# Altium PCB PCB.PcbDoc
Units mm, origin at the board's own origin, x right, y up, seen from the top; angles counter-clockwise.
Board outline 65.41 x 56.4 mm, 2 copper layers (Top Layer, Bottom Layer); 36 components, 31 nets, 204 pads, 254 vias.
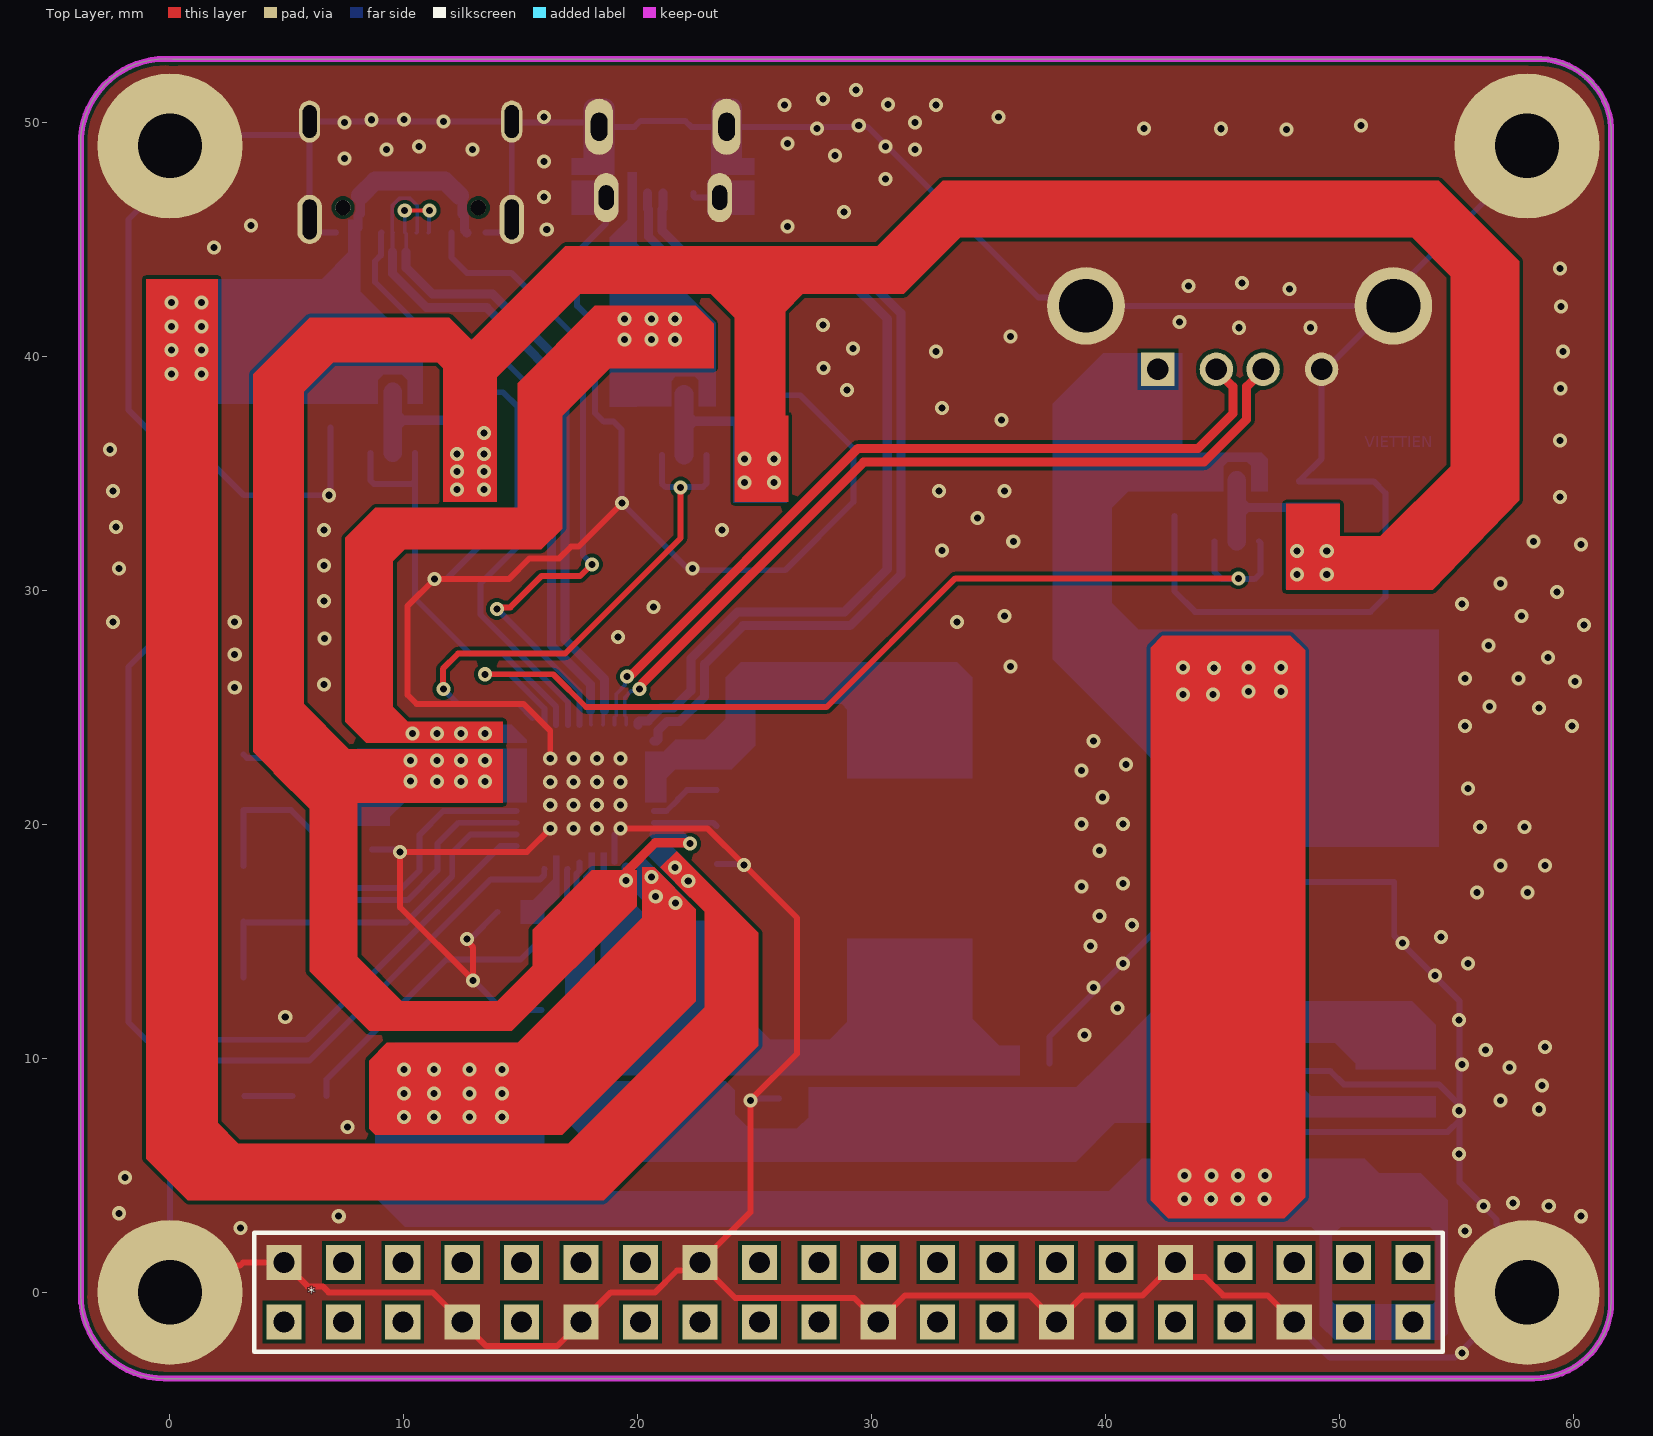
[diagram p0: Top Layer view]
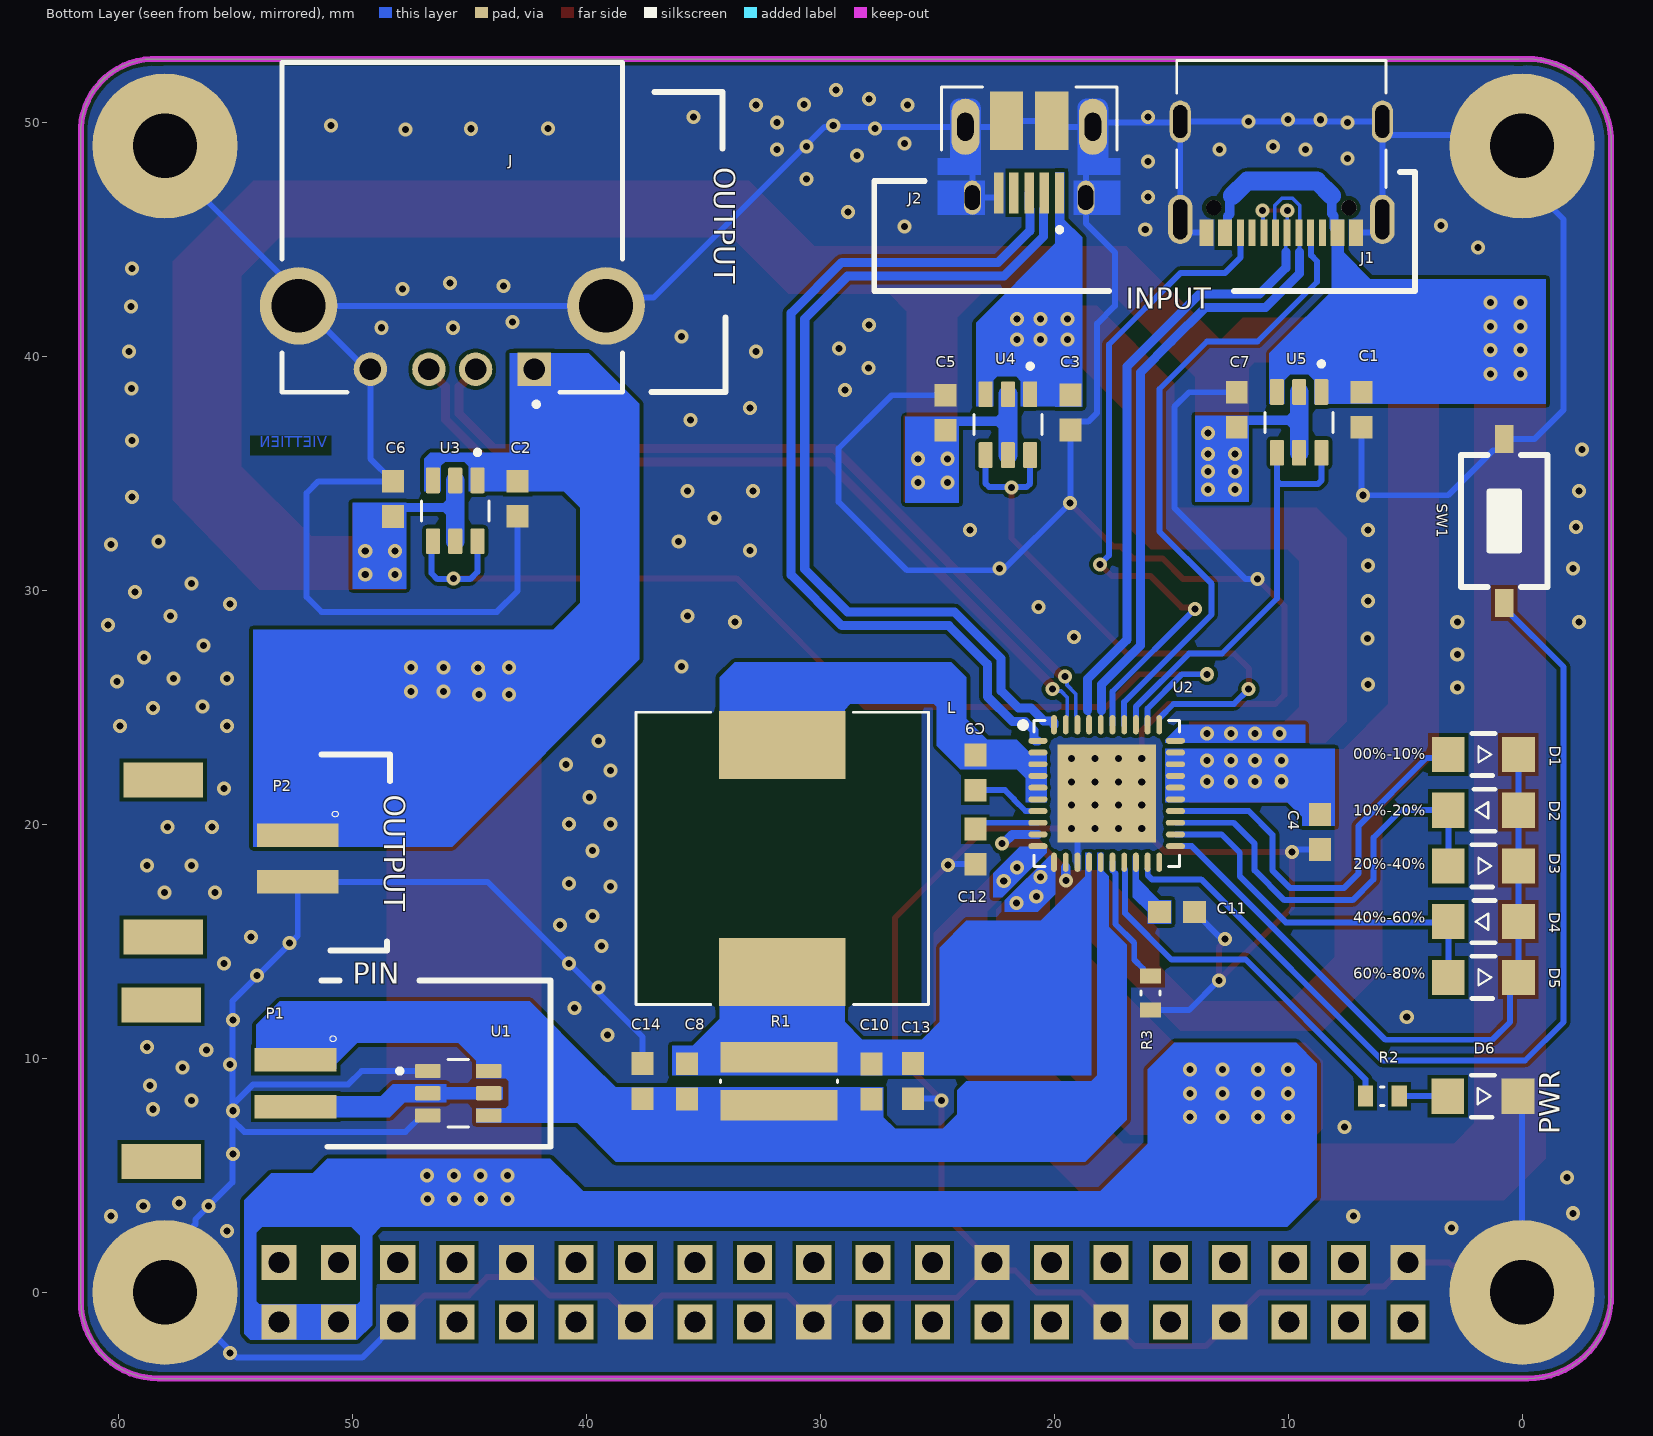
[diagram p1: Bottom Layer view, seen from below]
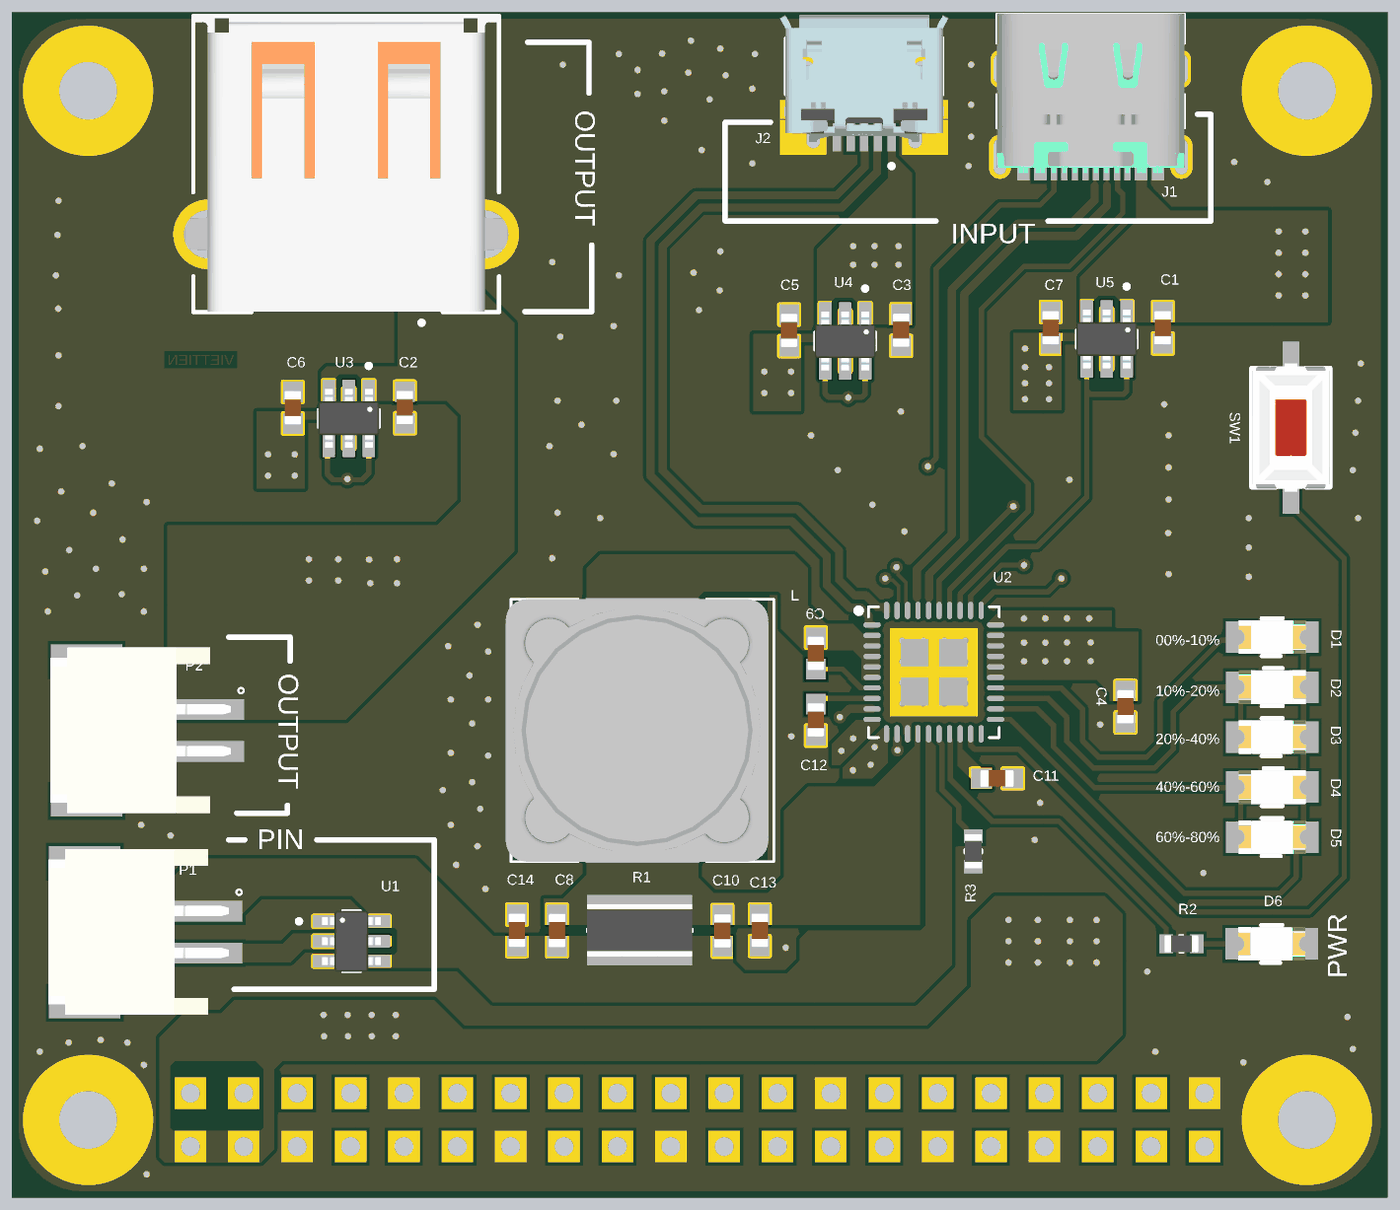
[diagram p2: 3D render of the assembled board from below, using the file's embedded part models]

## Layer stack, top to bottom
Top Solder: solder mask 0.0102, Solder Resist, Dk 3.5
Top Layer: signal copper 0.0356
Dielectric 1: dielectric 0.32, FR-4, Dk 4.8
Bottom Layer: signal copper 0.0356
Bottom Solder: solder mask 0.0102, Solder Resist, Dk 3.5

## Board outline
-0.254,-3.683 cw(c-0.254,-0.127) -3.81,-0.127 -3.81,49.403 cw(c-0.191,49.085) 0.127,52.705 58.293,52.705 cw(c58.483,49.593) 61.595,49.784 61.595,-0.381 cw(c58.293,-0.381) 58.293,-3.683

## Design rules (kind name [scope] priority, off if disabled: settings)
Clearance [All] p1: gap=0.154 ignorepadtopadclearanceinfootprint=FALSE
DiffPairsRouting C_D [InDifferentialPair('C_D')] p1: maxlimit=0.2 minlimit=0.2 mostfreqgap=0.2 toplayer_minwidth=0.16 toplayer_maxwidth=0.386 toplayer_prefwidth=0.386 bottomlayer_minwidth=0.16 bottomlayer_maxwidth=0.386 bottomlayer_prefwidth=0.386 impedanceprofiledriven=TRUE impedanceprofileid={D8D8F75F-E2CB-452B-AE5A-61E75BC29C10} impedanceprofilevalue=90.000000 maxuncoupledlength=12.7
DiffPairsRouting B_D [InDifferentialPair('B_D')] p2: maxlimit=0.2 minlimit=0.2 mostfreqgap=0.2 toplayer_minwidth=0.16 toplayer_maxwidth=0.386 toplayer_prefwidth=0.386 bottomlayer_minwidth=0.16 bottomlayer_maxwidth=0.386 bottomlayer_prefwidth=0.386 impedanceprofiledriven=TRUE impedanceprofileid={D8D8F75F-E2CB-452B-AE5A-61E75BC29C10} impedanceprofilevalue=90.000000 maxuncoupledlength=12.7
DiffPairsRouting A_D [InDifferentialPair('A_D')] p3: maxlimit=0.2 minlimit=0.2 mostfreqgap=0.2 toplayer_minwidth=0.16 toplayer_maxwidth=0.386 toplayer_prefwidth=0.386 bottomlayer_minwidth=0.16 bottomlayer_maxwidth=0.386 bottomlayer_prefwidth=0.386 impedanceprofiledriven=TRUE impedanceprofileid={D8D8F75F-E2CB-452B-AE5A-61E75BC29C10} impedanceprofilevalue=90.000000 maxuncoupledlength=12.7
HoleSize [All] p1: absolutevalues=TRUE maxlimit=10 minlimit=0.025 maxpercent=80.000 minpercent=20.000
MinimumSolderMaskSliver [All] p1: minsoldermaskwidth=0.01
PolygonConnect [All] p1: connectstyle=Direct reliefconductorwidth=0.254 reliefentries=4 polygonreliefangle="90 Angle" airgapwidth=0.254
RoutingVias [All] p1: holewidth=0.3 width=0.6 viastyle="Through Hole" minholewidth=0.3 minwidth=0.6 maxholewidth=0.3 maxwidth=0.6
SilkToSilkClearance [All] p1: silktosilkclearance=0.01
SilkToSolderMaskClearance [IsPad] p1: minsilkscreentomaskgap=0.01 clearancetoexposedcopper=TRUE
SolderMaskExpansion [All] p1: expansion=0 istentingtop=FALSE
SupplyNets "Schematic Supply Nets_4" [InNet('VOUT')] p1: voltage=0.000
SupplyNets "Schematic Supply Nets_3" [InNet('VBUS_A')] p2: voltage=0.000
SupplyNets "Schematic Supply Nets_2" [InNet('VBUS_C')] p3: voltage=0.000
SupplyNets "Schematic Supply Nets_1" [InNet('GND')] p4: voltage=0.000
SupplyNets "Schematic Supply Nets" [InNet('VBUS_B')] p5: voltage=0.000
Width VOUT [InNet('VOUT')] p1: maxlimit=0.8 minlimit=0.4 preferedwidth=0.6
Width VBUS_C [InNet('VBUS_C')] p2: maxlimit=0.8 minlimit=0.4 preferedwidth=0.6
Width VBUS_B [InNet('VBUS_B')] p3: maxlimit=0.8 minlimit=0.4 preferedwidth=0.6
Width VBUS_A [InNet('VBUS_A')] p4: maxlimit=0.8 minlimit=0.4 preferedwidth=0.6
Width [All] p5: maxlimit=0.254 minlimit=0.254 preferedwidth=0.254
25 further rules are at their usual default settings.

## Classes and differential pairs
differential pair C_D: +C_D_P -C_D_N
differential pair B_D: +B_D_P -B_D_N
differential pair A_D: +A_D_P -A_D_N

## Components (designator, comment, footprint, x,y, rotation, side; value= is the part's Value field where it differs from the comment)
* "J" GPIO_INTERFACE 3.6,2.54 r270 top locked
C1 "10uF" CAPC1608X94N 6.858,37.719 r90 bottom
C2 "10uF" CAPC1608X94N 42.926,33.921 r90 bottom
C3 "10uF" CAPC1608X94N 19.304,37.604 r90 bottom
C4 "22uF" CAPC1608X94N 8.636,19.673 r90 bottom
C5 "22uF" CAPC1608X94N 24.638,37.592 r270 bottom
C6 "22uF" CAPC1608X94N 48.26,33.909 r270 bottom
C7 "22uF" CAPC1608X94N 12.192,37.719 r270 bottom
C8 "100uF" CAPC1608X94N 35.687,9.017 r90 bottom
C9 "100uF" CAPC1608X94N 23.368,22.213 r90 bottom
C10 "22uF" CAPC1608X94N 27.813,9.005 r90 bottom
C11 "1uF" CAPC1608X94N 14.744,16.256 r0 bottom
C12 "1uF" CAPC1608X94N 23.368,19.05 r90 bottom
C13 "22uF" CAPC1608X94N 26.035,9.029 r270 bottom
C14 "22uF" CAPC1608X94N 37.592,9.029 r90 bottom
D1 "WL-SMCW_1206" WL-SMCW_1206 1.651,22.987 r0 bottom
D2 "WL-SMCW_1206" WL-SMCW_1206 1.651,20.606 r180 bottom
D3 "WL-SMCW_1206" WL-SMCW_1206 1.651,18.224 r0 bottom
D4 "WL-SMCW_1206" WL-SMCW_1206 1.651,15.843 r180 bottom
D5 "WL-SMCW_1206" WL-SMCW_1206 1.651,13.462 r0 bottom
D6 "WL-SMCW_1206" WL-SMCW_1206 1.675,8.382 r0 bottom
J "USBR-A-S-S-O-TH" SAMTEC_USBR-A-S-S-O-TH 45.72,42.164 r0 bottom
J1 "TypeC_12pin_12402012E212A" TypeC_12pin_12402012E212A 10.287,50.038 r0 bottom
J2 "10103594-0001LF" AMPHENOL_10103594-0001LF 21.067,49.815 r0 bottom
L "2.2uH" Introdutor_47uH_12x12x7 31.623,18.542 r90 bottom
P1 "S2B-PH-SM4-TB" JST_S2B-PH-SM4-TB 52.416,8.938 r90 bottom
P2 "S2B-PH-SM4-TB" JST_S2B-PH-SM4-TB 52.324,18.542 r90 bottom
R1 "5mR" RES_ERJB1CFR015U 31.75,9.026 r270 bottom
R2 "2K" RES_ERJU03J474V 5.969,8.382 r0 bottom
R3 "10K" RES_ERJU03J474V 15.875,12.79 r90 bottom
SW1 "Nut Nhan 2 Chan SMD 3x6x2.5" PCBComponent_1 -1.016,28.9 r90 bottom
U1 "SC8205S" IC_SN6505ADBVR 45.466,8.509 r180 bottom
U2 "SW6106" QFN50P600X600X80-41N 17.752,21.32 r180 bottom
U3 "SC8205S" IC_SN6505ADBVR 45.593,33.401 r270 bottom
U4 "SC8205S" IC_SN6505ADBVR 21.971,37.084 r270 bottom
U5 "SC8205S" IC_SN6505ADBVR 9.525,37.181 r270 bottom

## Footprints (in the part's own frame and the unit in brackets; to place one, negate y for a bottom-side part, rotate by r counter-clockwise, add the part's x,y. Pads: shape width x height; smd on the part's side, far side on the other; paste and mask are expansions set on the pad)
AMPHENOL_10103594-0001LF [mm]
  rect 0.4x1.75 smd: 1(-1.3,2.825) 2(-0.65,2.825) 3(0,2.825) 4(0.65,2.825) 5(1.3,2.825)
  oval 0.73x1.46 hole 0.65 slot 1.05 at 90 deg mask+0: 6(-2.425,3.03) 7(2.425,3.03)
  oval 1.2x2.4 hole 0.7 slot 1.2 at 90 deg: 8(-2.725,0) 9(2.725,0)
  oval 1.05x2.1 smd far side paste-2: 10(-2.425,3.03) 11(2.425,3.03)
  rect 1.425x2.5 smd: S1(-0.962,-0.25) S2(0.962,-0.25)
  Top Layer region: -1.9,2.3 -3.9,2.3 -3.9,3.76 -1.9,3.76
  Top Layer region: 3.9,2.3 1.9,2.3 1.9,3.76 3.9,3.76
  Top Layer region: -2.075,-0.8 -2.076,-0.821 -2.077,-0.842 -2.08,-0.863 -2.084,-0.883 -2.089,-0.904 -2.095,-0.924 -2.102,-0.943 -2.11,-0.963 -2.119,-0.982 -2.129,-1 -2.14,-1.018 -2.151,-1.035 -2.164,-1.052 -2.178,-1.068 -2.192,-1.083 -2.207,-1.097 -2.223,-1.111 -2.24,-1.124 -2.257,-1.135 -2.275,-1.146 -2.293,-1.156 -2.312,-1.165 -2.332,-1.173 -2.351,-1.18 -2.371,-1.186 -2.392,-1.191 -2.412,-1.195 -2.433,-1.198 -2.454,-1.199 -2.475,-1.2 -2.975,-1.2 -2.996,-1.199 -3.017,-1.198 -3.038,-1.195 -3.058,-1.191 -3.079,-1.186 -3.099,-1.18 -3.118,-1.173 -3.138,-1.165 -3.157,-1.156 -3.175,-1.146 -3.193,-1.135 -3.21,-1.124 -3.227,-1.111 -3.243,-1.097 -3.258,-1.083 -3.272,-1.068 -3.286,-1.052 -3.299,-1.035 -3.31,-1.018 -3.321,-1 -3.331,-0.982 -3.34,-0.963 -3.348,-0.943 -3.355,-0.924 -3.361,-0.904 -3.366,-0.883 -3.37,-0.863 -3.373,-0.842 -3.374,-0.821 -3.375,-0.8 -3.375,1.35 -3.9,1.35 -3.9,2.05 -2.075,2.05
  Top Layer region: 3.9,1.35 3.375,1.35 3.375,-0.8 3.374,-0.821 3.373,-0.842 3.37,-0.863 3.366,-0.883 3.361,-0.904 3.355,-0.924 3.348,-0.943 3.34,-0.963 3.331,-0.982 3.321,-1 3.31,-1.018 3.299,-1.035 3.286,-1.052 3.272,-1.068 3.258,-1.083 3.243,-1.097 3.227,-1.111 3.21,-1.124 3.193,-1.135 3.175,-1.146 3.157,-1.156 3.138,-1.165 3.118,-1.173 3.099,-1.18 3.079,-1.186 3.058,-1.191 3.038,-1.195 3.017,-1.198 2.996,-1.199 2.975,-1.2 2.475,-1.2 2.454,-1.199 2.433,-1.198 2.412,-1.195 2.392,-1.191 2.371,-1.186 2.351,-1.18 2.332,-1.173 2.312,-1.165 2.293,-1.156 2.275,-1.146 2.257,-1.135 2.24,-1.124 2.223,-1.111 2.207,-1.097 2.192,-1.083 2.178,-1.068 2.164,-1.052 2.151,-1.035 2.14,-1.018 2.129,-1 2.119,-0.982 2.11,-0.963 2.102,-0.943 2.095,-0.924 2.089,-0.904 2.084,-0.883 2.08,-0.863 2.077,-0.842 2.076,-0.821 2.075,-0.8 2.075,2.05 3.9,2.05
  silkscreen extent -3.75,-1.7 3.75,4.5, body extent -4.02,-2.79 4.02,3.24, height 2.89
CAPC1608X94N [mm]
  rect 0.97x0.94 smd paste+0 mask+0.102: 1(-0.75,0) 2(0.75,0)
  body extent -0.8,-0.4 0.8,0.4, height 0.94
GPIO_INTERFACE [mm]
  rect 1.5x1.5 hole 0.9: 1(1.27,49.53) 2(3.81,49.53) 3(1.27,46.99) 4(3.81,46.99) 5(1.27,44.45) 6(3.81,44.45) 7(1.27,41.91) 8(3.81,41.91) 9(1.27,39.37) 10(3.81,39.37) 11(1.27,36.83) 12(3.81,36.83) 13(1.27,34.29) 14(3.81,34.29) 15(1.27,31.75) 16(3.81,31.75) 17(1.27,29.21) 18(3.81,29.21) 19(1.27,26.67) 20(3.81,26.67) 21(1.27,24.13) 22(3.81,24.13) 23(1.27,21.59) 24(3.81,21.59) 25(1.27,19.05) 26(3.81,19.05) 27(1.27,16.51) 28(3.81,16.51) 29(1.27,13.97) 30(3.81,13.97) 31(1.27,11.43) 32(3.81,11.43) 33(1.27,8.89) 34(3.81,8.89) 35(1.27,6.35) 36(3.81,6.35) 37(1.27,3.81) 38(3.81,3.81) 39(1.27,1.27) 40(3.81,1.27)
  silkscreen extent 0,0 5.08,50.8
IC_SN6505ADBVR [mm]
  rrect17% 1.1x0.6 smd paste+0 mask+0: 1(-1.3,0.95) 2(-1.3,0) 3(-1.3,-0.95) 4(1.3,-0.95) 5(1.3,0) 6(1.3,0.95)
  silkscreen extent -2.6,-1.45 0.43,1.45, body extent -1.4,-1.45 1.4,1.45, height 1.45
Introdutor_47uH_12x12x7 [mm]
  rect 2.9x5.4 smd: 1(-4.85,0) 2(4.85,0)
  silkscreen extent -6.25,-6.25 6.25,6.25, body extent -6.25,-6 6.25,6.5, height 6
JST_S2B-PH-SM4-TB [mm]
  rect 1x3.5 smd: 1(1,0) 2(-1,0)
  rect 1.5x3.4 smd: P1(3.35,5.75) P2(-3.35,5.75)
  silkscreen extent 1.77,-1.73 2.03,-1.47, body extent -3.94,-1.12 3.96,7.48, height 5.63
PCBComponent_1 [mm]
  rect 1.2x0.8 smd: 1(0.564,1.778) 2(7.564,1.778)
  silkscreen extent 1.24,-0.08 6.88,3.63, body extent 1.01,-0.07 7.11,3.63, height 2.5
QFN50P600X600X80-41N [mm] "QFN, 40-Leads, Body 6.00x6.00mm, Pitch 0.50mm, Thermal Pad 4.20x4.20mm, IPC Medium Density"
  oval 0.825x0.25 smd: 1(-2.937,2.25) 2(-2.937,1.75) 3(-2.937,1.25) 4(-2.937,0.75) 5(-2.937,0.25) 6(-2.937,-0.25) 7(-2.937,-0.75) 8(-2.937,-1.25) 9(-2.937,-1.75) 10(-2.937,-2.25) 21(2.937,-2.25) 22(2.937,-1.75) 23(2.937,-1.25) 24(2.937,-0.75) 25(2.937,-0.25) 26(2.937,0.25) 27(2.937,0.75) 28(2.937,1.25) 29(2.937,1.75) 30(2.937,2.25)
  oval 0.25x0.825 smd: 11(-2.25,-2.937) 12(-1.75,-2.937) 13(-1.25,-2.937) 14(-0.75,-2.937) 15(-0.25,-2.937) 16(0.25,-2.937) 17(0.75,-2.937) 18(1.25,-2.937) 19(1.75,-2.937) 20(2.25,-2.937) 31(2.25,2.937) 32(1.75,2.937) 33(1.25,2.937) 34(0.75,2.937) 35(0.25,2.937) 36(-0.25,2.937) 37(-0.75,2.937) 38(-1.25,2.937) 39(-1.75,2.937) 40(-2.25,2.937)
  rect 4.2x4.2 smd paste-2.1: 41(0,0)
  silkscreen extent -3.7,-3.11 3.11,3.11, body extent -3.05,-3.05 3.05,3.05, height 0.8
RES_ERJB1CFR015U [mm]
  rect 1.3x5 smd: 1(-1.025,0) 2(1.025,0)
  silkscreen extent -0.06,-2.5 0.06,2.5, body extent -1.25,-2.5 1.25,2.5, height 0.55
RES_ERJU03J474V [mm]
  rect 0.65x0.9 smd: 1(-0.725,0) 2(0.725,0)
  silkscreen extent -0.08,-0.4 0.08,0.4, body extent -0.8,-0.4 0.8,0.4, height 0.45
SAMTEC_USBR-A-S-S-O-TH [mm]
  rect 1.428x1.428 hole 0.92: 1(-3.5,2.71)
  round 1.428 hole 0.92: 2(-1,2.71) 3(1,2.71) 4(3.5,2.71)
  round 3.316 hole 2.3: S1(-6.57,0) S2(6.57,0)
  silkscreen extent -7.27,-10.4 7.27,4.31, body extent -7.85,-10.42 7.85,3.68, height 7.77
TypeC_12pin_12402012E212A [mm]
  rect 0.6x1.14 smd: A1_B12(-3.2,4.75) A4_B9(-2.4,4.75) B1_A12(3.2,4.75) B4_A9(2.4,4.75)
  rect 0.3x1.14 smd: A5(-1.25,4.75) A6(-0.25,4.75) A7(0.25,4.75) A8(1.25,4.75) B5(1.75,4.75) B6(0.75,4.75) B7(-0.75,4.75) B8(-1.75,4.75)
  oval 1.05x2.1 hole 0.6 slot 1.7 at 90 deg: SH1(-4.32,4.18) SH2(4.32,4.18)
  oval 0.9x1.8 hole 0.6 slot 1.4 at 90 deg: SH3(-4.32,0) SH4(4.32,0)
  round 0.65 hole 0.65 unplated: ""(-2.89,3.68) ""(2.89,3.68)
  silkscreen extent -4.47,-2.6 4.47,2.81, body extent -4.47,-2.65 4.47,4.95, height 3.15
WL-SMCW_1206 [mm]
  rect 1.4x1.5 smd: 1(-1.5,0) 2(1.5,0)
  silkscreen extent -0.5,-0.9 0.5,0.9, body extent -1.6,-0.8 1.6,0.8, height 0.68

## Part data
*: library part RASPBERRY_INTERFACE, "RASPBERRY_INTERFACE"
C1 C2 C3 C4 C5 C6 C7 C8 C9 C10 C11 C12 C13 C14: library part cap_0603_VJ0603D3R9DXCAP, "cap 0603 (1608 Metric)", Package="1608 Vishay Vitramon", Check_prices=https://www.snapeda.com/parts/VJ0603D3R9DXCAP/Vishay/view-part/?ref=eda, MF="Vishay Vitramon", MP=VJ0603D3R9DXCAP, SnapEDA_Link=https://www.snapeda.com/parts/VJ0603D3R9DXCAP/Vishay/view-part/?ref=snap
D1 D2 D3 D4 D5 D6: "1206, Blue Typ.(@20mA): 470nm, 145mcd, 3.2V, 140Â° InGaN", Package="1206 Wurth Electronics", Check_prices=https://www.snapeda.com/parts/150120BS75000/Wurth+Electronics/view-part/?ref=eda, MF="Wurth Electronics", MP=150120BS75000, SnapEDA_Link=https://www.snapeda.com/parts/150120BS75000/Wurth+Electronics/view-part/?ref=snap
J: "USB-A _USB TYPE-A_ USB 2.0 Receptacle Connector 4 Position Through Hole, Right Angle", Package=None, Availability=Unavailable, MF=Samtec, MP=USBR-A-S-S-O-TH, Price=None, SnapEDA_Link=https://www.snapeda.com/parts/USBR-A-S-S-O-TH/Samtec%20Inc./view-part/279681/?ref=snap
J1: "USB2.0, Type C, Top mount, CH 1.68mm, Dual Row SMT", Package=None, Availability="In Stock", Check_prices=https://www.snapeda.com/parts/12402012E212A/Amphenol/view-part/?ref=eda, MF="Amphenol ICC (Commercial Products)", MP=12402012E212A, Price=None, Purchase-URL=https://pricing.snapeda.com/search/part/12402012E212A/?ref=eda, SnapEDA_Link=https://www.snapeda.com/parts/12402012E212A/Amphenol/view-part/?ref=snap
J2: "USB - micro B USB 2.0 Receptacle Connector 5 Position Surface Mount, Right Angle; Through Hole", Package=None, Availability=Unavailable, MF="{'manufacturer': u'Amphenol ICC (FCI)'}", MP=10103594-0001LF, Price=None
L: library part Introdutor_47uH_12x12x7SRR1260-470M, "SMD CDRH127 1280-220 22uH 6.3A", Package="Nonstandard Bourns", Availability=Unavailable, MF=Bourns, MP=SRR1260-470M, Price=None, SnapEDA_Link=https://www.snapeda.com/parts/SRR1260-470M/Bourns/view-part/283129/?ref=snap
P1 P2: "Connector Header Surface Mount, Right Angle 2 position 0.079 (2.00mm)", Package=None, Check_prices=https://www.snapeda.com/parts/S2B-PH-SM4-TB/JST/view-part/?ref=eda, MF="JST Sales", MP=S2B-PH-SM4-TB, SnapEDA_Link=https://www.snapeda.com/parts/S2B-PH-SM4-TB/JST/view-part/?ref=snap
R1: library part res_2512_ERJB1CFR015U, "RES 2512", Package=None, Availability=Unavailable, MP=ERJB1CFR015U, Price=None
R2 R3: library part res_0603_ERJU03J474V, "0603 Anti-Sulfurated", Package="1608-2 Panasonic", Check_prices=https://www.snapeda.com/parts/ERJU03J474V/Panasonic/view-part/?ref=eda, MF=Panasonic, MP=ERJU03J474V, SnapEDA_Link=https://www.snapeda.com/parts/ERJU03J474V/Panasonic/view-part/?ref=snap
U1 U3 U4 U5: "SC8205S – Dual N-Channel Enhancement Mode Power MOSFET, SOT-23-6 Package.", Package="SOT-23-6 Texas Instruments", Check_prices=https://www.snapeda.com/parts/SN6505ADBVR/Texas+Instruments/view-part/?ref=eda, MF="Texas Instruments", MP=SN6505ADBVR, SnapEDA_Link=https://www.snapeda.com/parts/SN6505ADBVR/Texas+Instruments/view-part/?ref=snap
U2: "SW6106 – Bidirectional Fast Charging Power Bank Management IC, 5V Output, QFN-40, 6×6mm."
SW1: Ma_Hang=MH001036, Ten="Nút Nhấn 2 Chân 3x6x2.5MM SMD"

## Free pads (board coordinates)
  round 6.2 hole 2.75: 17(0,0) 17(0,49) 17(58,0) 17(58,49)

## Via types
v1: diameter 0.6, hole 0.3, Top Layer to Bottom Layer, tented both sides, 238 vias
v2: diameter 0.6, hole 0.3, Top Layer to Bottom Layer, 16 vias

## Nets (pads, with @x,y where several pads share a name; then routed paths per layer and width w, separated by ;. In a path a pad name is that pad's centre, name@x,y a point inside that pad or via, vN(x,y) a via of type N, cw(c..) or ccw(c..) an arc to the next point about the centre after c; other vN are vias at no path point)
A_D_N: J.2 U2.38 | length 35
  Top Layer w0.386: v1(19.533,26.314) 19.591,26.314 19.698,26.421 19.759,26.421 29.405,36.068 43.942,36.068 45.427,37.553 45.427,38.707 44.72,39.414 J.2
  Bottom Layer w0.16: U2.38 19.002,24.569 19.072,24.639 19.072,25.575 19.45,25.953 19.45,26.232 v1(19.533,26.314)
A_D_P: J.3 U2.39 | length 35.2
  Top Layer w0.386: v1(20.066,25.781) 20.066,25.839 20.173,25.946 20.173,26.007 29.648,35.482 44.185,35.482 46.013,37.31 46.013,38.707 46.72,39.414 J.3
  Bottom Layer w0.16: U2.39 19.502,24.569 19.432,24.639 19.432,25.426 19.705,25.698 19.983,25.698 v1(20.066,25.781)
B_D_N: J2.2 U2.40 | length 38.5
  Bottom Layer w0.386: U2.40 20.002,24.356 20.07,24.424 20.442,24.424 20.995,24.977 21.529,24.977 22.261,25.708 22.261,27.087 24.257,29.083 28.829,29.083 30.656,30.91 30.656,41.607 28.829,43.434 22.144,43.434 20.449,45.129 20.449,45.768 20.449,46.283 20.417,46.315 J2.2
B_D_P: J2.3 U2.1 | length 39
  Bottom Layer w0.386: U2.1 20.789,23.57 20.857,23.638 20.857,24.01 21.238,24.391 21.772,24.391 22.847,25.466 22.847,26.844 24.5,28.497 29.072,28.497 31.242,30.667 31.242,41.85 29.072,44.02 22.387,44.02 21.035,45.372 21.035,45.525 21.035,46.283 21.067,46.315 J2.3
BAT+: C8.1 C10.1 C14.1 P1.1 R1.2 U1.4 U1.6 U2.15
C_D_N: J1.A7 J1.B7 U2.36 | length 29.7
  Bottom Layer w0.16: 9.511,44.464 9.511,45.262 J1.B7 9.499,45.326 9.499,46.449 9.812,46.762 10.254,46.762 10.567,46.449 10.567,45.318 J1.A7 ; 17.976,24.878 17.985,24.869 17.985,24.274 U2.36
  Bottom Layer w0.386: 9.511,44.464 9.511,43.542 10.967,42.086 13.54,42.086 14.986,40.64 16.305,39.321 16.305,27.648 17.976,25.977 17.976,24.878
C_D_P: J1.A6 J1.B6 U2.37 | length 29.1
  Top Layer w0.16: v1(10.033,46.228) 10.04,46.235 11.094,46.235 v1(11.101,46.241)
  Bottom Layer w0.16: v1(10.033,46.228) 10.035,46.226 10.035,45.29 10.097,45.228 10.097,44.464 ; J1.B6 11.069,45.32 11.069,46.209 v1(11.101,46.241) ; U2.37 18.519,24.274 18.519,24.835 18.562,24.878
  Bottom Layer w0.386: 10.097,44.464 10.097,43.785 11.21,42.672 13.783,42.672 16.891,39.564 16.891,27.891 18.562,26.22 18.562,24.878
CC1: J1.A5 U2.34 | length 27.7
  Bottom Layer w0.254: J1.A5 9.014,45.265 9.014,44.32 8.763,44.069 8.763,43.18 11.303,40.64 13.462,40.64 15.494,38.608 15.494,32.512 13.262,30.28 13.262,28.969 14.115,28.117 17.002,25.229 U2.34
CC2: J1.B5 U2.35 | length 29
  Top Layer w0.254: v1(13.97,29.21) 14.036,29.276 14.544,29.276 15.875,30.607 17.526,30.607 v1(18.034,31.115)
  Bottom Layer w0.254: J1.B5 12.037,44.224 12.7,43.561 14.605,43.561 17.653,40.513 17.653,31.496 v1(18.034,31.115) ; v1(13.97,29.21) 17.502,25.678 U2.35
GATE-A: U2.32 U3.4 U3.6 | length 43.8
  Top Layer w0.254: v1(13.462,26.416) 16.383,26.416 17.78,25.019 28.067,25.019 33.564,30.516 v1(45.662,30.516)
  Bottom Layer w0.254: v1(13.462,26.416) 14.536,26.416 16.002,24.95 U2.32 ; U3.6 44.643,30.795 44.958,30.48 46.355,30.48 46.609,30.734 46.609,32.035 U3.4
GATE-B: U2.31 U4.4 U4.6 | length 24.3
  Top Layer w0.254: v1(11.684,25.781) 11.664,25.801 11.664,26.436 11.662,26.438 11.662,26.648 12.319,27.305 16.891,27.305 21.826,32.24 v1(21.826,34.396)
  Bottom Layer w0.254: v1(11.684,25.781) 12.319,25.146 14.897,25.146 U2.31@15.5,24.543 ; U4.6 21.021,34.566 21.17,34.417 22.772,34.417 22.921,34.566 U4.4
GATE-C: U2.33 U5.4 U5.6 | length 18.2
  Bottom Layer w0.254: U5.6 8.575,34.693 8.724,34.544 10.326,34.544 10.475,34.693 ; U5.4 10.475,29.652 12.822,27.305 14.224,27.305 16.502,25.027 U2.33
GND: *.6 *.9 *.14 *.20 *.25 *.30 *.34 *.39 C1.1 C2.1 C3.1 C4.1 C5.1 C6.1 C7.1 C11.1 C12.1 C13.2 C14.2 D6.1 J1.A1_B12 J1.B1_A12 J1.SH1 J1.SH2 J1.SH3 J1.SH4 J2.5 J2.6 J2.7 J2.8 J2.9 J2.10 J2.11 J2.S1 J2.S2 J.4 J.S1 J.S2 P2.2 pad.17 R3.1 SW1.2 U1.1 U1.3 U2.13 U2.41 | length 392.4
  Top Layer w0.254: pad.17@0,0 1.138,1.138 2.99,1.138 3.122,1.27 *.39 5.886,0.254 6.529,0.254 6.783,0 11.22,0 *.34 13.521,-2.301 16.539,-2.301 *.30 18.84,0 20.737,0 21.668,0.93 22.31,0.93 *.25 ; v1(12.694,15.098) 12.694,15.004 12.954,14.744 v1(12.954,13.335) 9.839,16.45 v1(9.839,18.823) 15.255,18.823 v2(16.252,19.82) ; v2(16.252,22.819) 16.252,24.007 15.113,25.146 10.541,25.146 10.16,25.527 10.16,29.337 v1(11.303,30.48) 14.478,30.48 15.367,31.369 16.637,31.369 17.145,31.877 17.467,31.877 v1(19.321,33.731) ; v2(19.252,19.82) 22.981,19.82 v1(24.538,18.263) 26.797,16.004 26.797,10.197 v1(24.803,8.203) 24.803,3.423 *.25 ; *.6 46.907,-0.127 45.01,-0.127 44.236,0.647 43.593,0.647 *.9 41.573,-0.127 39.033,-0.127 *.14 36.747,-0.127 31.413,-0.127 *.20 29.239,-0.239 24.159,-0.239 *.25
  Bottom Layer w0.254: pad.17@0,0 0,8.207 D6.1 ; J1.SH3 J1.SH4 ; C1.1 6.858,34.136 v1(6.789,34.067) 3.159,34.067 1.235,35.991 1.035,35.991 0.762,36.264 SW1.2 -0.523,36.464 -1.778,37.719 -1.778,45.855 0,47.633 0,49 0.464,49.464 5.669,49.464 5.967,49.763 J1.SH1 5.967,45.656 6.335,45.288 J1.A1_B12 ; C4.1 9.739,18.923 v1(9.839,18.823) ; v1(11.303,30.48) 11.811,30.48 14.859,33.528 14.859,37.846 14.236,38.469 C7.1 ; v1(12.694,15.098) 12.836,15.098 C11.1 ; v1(12.954,13.335) 14.224,12.065 R3.1 ; J1.B1_A12 14.239,45.288 14.607,45.656 J1.SH2 J1.SH4 ; U2.13 19.002,19.57 v2(19.252,19.82) ; J2.5 22.367,46.858 22.44,46.785 J2.7 23.492,48.659 23.792,48.959 J2.9 ; C12.1 24.501,18.3 v1(24.538,18.263) ; C5.1 26.936,38.342 29.21,36.068 29.21,33.782 26.289,30.861 22.192,30.861 v1(19.321,33.731) 19.304,33.749 19.304,36.868 18.961,37.211 18.542,37.211 18.161,37.592 18.161,41.402 17.399,42.164 17.399,44.45 18.642,45.693 J2.6 18.642,48.659 18.342,48.959 J2.8 ; v1(24.803,8.203) 24.879,8.279 C13.2 ; C14.2 37.592,10.922 44.212,17.542 P2.2 52.324,15.24 55.118,12.446 v1@55.118,8.001 ; C2.1 42.926,29.972 43.815,29.083 51.308,29.083 51.943,29.718 51.943,34.163 51.447,34.659 C6.1 ; U1.3 47.016,7.559 47.717,6.858 54.61,6.858 55.118,7.366 ; U1.1 49.596,9.459 50.165,8.89 54.229,8.89 v1@55.118,8.001 ; *.6 49.574,-2.794 54.909,-2.794 57.703,0 58,0 58,1.609 56.701,2.908 56.701,3.116 55.118,4.699 55.118,5.92 55.118,7.366 ; C6.1@48.26,34.674 49.22,35.634 J.4 49.4,39.454 52.11,42.164 J.S1 38.796,42.518 37.111,42.518 29.814,49.815 J2.9 ; J.S2 52.29,42.727 58,48.437 pad.17@58,49 ; J1.SH4 14.643,50.002 18.156,50.002 J2.8 ; J2.8 19.855,49.815 J2.S1 J2.S2 22.28,49.815 J2.9 ; 55.118,7.366 v1@55.118,8.001
  other v1: 55.218,-2.589 55.345,2.618 3.021,2.745 7.212,3.253 60.298,3.253 -2.186,3.38 56.134,3.683 58.928,3.683 57.404,3.81 -1.932,4.904 55.091,5.92 7.593,7.063 55.091,7.761 58.52,7.825 56.869,8.206 58.647,8.841 57.25,9.603 55.218,9.73 56.234,10.365 58.774,10.492 39.089,11 55.091,11.635 4.926,11.762 40.486,12.143 39.47,13.032 54.075,13.54 40.74,14.048 55.472,14.048 39.343,14.81 52.678,14.937 54.329,15.191 41.121,15.699 39.724,16.08 55.853,17.096 58.012,17.096 38.962,17.35 40.74,17.477 56.869,18.239 58.774,18.239 39.724,18.874 55.98,19.89 57.885,19.89 38.962,20.017 40.74,20.017 39.851,21.16 55.472,21.541 38.962,22.303 40.867,22.557 39.47,23.573 55.345,24.208 59.917,24.208 58.52,24.97 56.4,25.029 2.767,25.859 6.577,25.986 60.044,26.113 55.345,26.24 57.631,26.24 35.914,26.748 58.901,27.129 2.767,27.256 56.361,27.637 6.604,27.94 19.15,28.018 60.425,28.526 -2.44,28.653 2.767,28.653 33.628,28.653 35.66,28.907 57.758,28.907 20.674,29.288 55.218,29.415 6.577,29.542 59.282,29.923 56.869,30.304 -2.186,30.939 22.325,30.939 6.577,31.066 32.993,31.701 60.298,31.955 36.041,32.082 58.266,32.082 6.577,32.59 23.595,32.59 -2.313,32.717 34.517,33.098 59.409,33.987 -2.44,34.241 32.866,34.241 35.66,34.241 -2.567,36.019 59.409,36.4 35.533,37.289 32.993,37.797 28.929,38.559 59.421,38.627 27.94,39.497 32.739,40.21 59.536,40.21 29.183,40.337 35.914,40.845 45.693,41.226 48.741,41.226 27.913,41.353 43.153,41.48 59.459,42.139 47.852,42.877 43.534,43.004 45.82,43.131 59.409,43.766 1.878,44.655 16.102,45.417 26.389,45.544 3.459,45.606 28.802,46.179 15.975,46.814 30.58,47.576 15.975,48.338 7.466,48.465 28.421,48.592 9.244,48.846 12.927,48.846 31.85,48.846 10.641,48.973 30.58,48.973 26.389,49.1 47.713,49.693 27.659,49.735 41.629,49.735 44.918,49.731 29.437,49.862 50.9,49.862 7.466,49.989 31.85,49.989 11.697,50.046 8.609,50.116 10.009,50.126 15.975,50.243 35.406,50.243 26.262,50.751 32.739,50.751 30.684,50.769 27.913,51.005 29.31,51.386
  other v2: 17.252,19.82 18.252,19.82 16.252,20.82 17.252,20.82 18.252,20.82 19.252,20.82 16.252,21.819 17.252,21.819 18.252,21.819 19.252,21.819 17.252,22.819 18.252,22.819 19.252,22.819
KEY: SW1.1 U2.19 | length 41
  Bottom Layer w0.254: SW1.1 0.762,29.264 -1.778,26.724 -1.778,11.557 -0.127,9.906 5.969,9.906 13.716,17.653 15.824,17.653 15.996,17.825 15.996,18.092 U2.19@16,18.096
NetC8_2: C8.2 C10.2 C13.1 L.1 R1.1 U2.14
NetC9_1: C9.1 U2.7 | length 3.1
  Bottom Layer w0.254: U2.7 20.691,20.571 21.223,20.571 21.717,21.066 21.717,21.082 22.098,21.463 C9.1
NetC9_2: C9.2 L.2 U2.2 U2.3 U2.4 U2.5 U2.6
NetC11_2: C11.2 U2.18
NetC12_2: C12.2 U2.8 | length 2.7
  Bottom Layer w0.254: U2.8 23.226,20.07 C12.2@23.368,19.927
NetD1_1: D1.1 D2.2 D3.1 D4.2 D5.1 U2.21 | length 29.6
  Bottom Layer w0.254: D1.1 0.151,20.606 D3.1 D4.2 D5.1 0.508,13.105 0.508,11.557 1.27,10.795 5.842,10.795 14.116,19.069 U2.21
NetD1_2: D1.2 U2.24 | length 17.5
  Bottom Layer w0.254: D1.2 3.297,22.841 4.083,22.841 6.985,19.939 6.985,17.907 7.62,17.272 9.906,17.272 10.668,18.034 10.668,19.558 11.679,20.569 U2.24
NetD2_1: D2.1 D3.2 U2.23 | length 18.7
  Bottom Layer w0.254: D3.2 D2.1 5.175,20.606 6.35,19.431 6.35,17.653 7.239,16.764 10.16,16.764 11.43,18.034 11.43,19.177 12.323,20.07 U2.23
NetD4_1: D4.1 D5.2 U2.22 | length 16.2
  Bottom Layer w0.254: D5.2 D4.1 ; D4.1@3.151,15.813 10.098,15.813 12.065,17.78 12.065,18.796 12.839,19.57 U2.22
NetD6_2: D6.2 R2.1 | length 2.1
  Bottom Layer w0.254: D6.2 R2.1
NetP1_2: P1.2 U1.2 U1.5 | length 2.6
  Bottom Layer w0.254: U1.5 U1.2
NetR2_2: R2.2 U2.17 | length 15.8
  Bottom Layer w0.254: R2.2 6.694,9.107 11.811,14.224 14.986,14.224 16.964,16.202 16.964,18.06 U2.17@17,18.096
NetR3_2: R3.2 U2.16 | length 5.6
  Bottom Layer w0.254: R3.2 16.029,13.669 16.154,13.669 16.198,13.713 16.198,13.838 16.574,14.214 16.574,14.939 17.372,15.737 17.372,17.896 17.502,18.026 U2.16
VBUS_A: *.2 *.4 C2.2 J.1 P2.1 U2.11 U3.1 U3.3 | length 17
  Top Layer w0.8: v1(14.197,9.523) 17.27,9.523 20.761,13.014 v1(20.761,16.913)
  Bottom Layer w0.8: J.1 42.22,35.392 42.926,34.686 C2.2
  other v1: 43.364,3.983 44.5,3.983 45.635,3.983 46.771,3.983 43.364,4.999 44.507,4.999 45.65,4.999 46.793,4.999 10.006,7.491 11.276,7.491 12.8,7.491 14.197,7.491 10.006,8.507 11.276,8.507 12.8,8.507 14.197,8.507 10.006,9.523 11.276,9.523 12.8,9.523 21.604,16.645 20.572,17.751 43.301,25.554 44.571,25.554 46.095,25.681 47.492,25.681 44.627,26.68 43.301,26.697 46.095,26.697 47.492,26.697
VBUS_B: C3.2 J2.1 U2.30 U4.1 U4.3
  other v1: 10.358,23.876 11.416,23.876 12.446,23.876 13.462,23.876 19.432,40.716 20.575,40.716 21.591,40.716 19.432,41.605 20.575,41.605 21.591,41.605
VBUS_C: C1.2 J1.A4_B9 J1.B4_A9 U2.10 U5.1 U5.3 | length 8.4
  Bottom Layer w0.4: J1.A4_B9 7.887,45.393 7.987,45.493 8.033,45.493 8.033,46.005 8.128,46.1 8.128,46.863 ; 12.192,46.863 12.381,46.863 12.498,46.746 12.498,46.077 12.587,45.988 12.587,45.388 J1.B4_A9
  Bottom Layer w0.8: 8.128,46.863 8.763,47.498 11.746,47.498 12.381,46.863
  other v1: 22.15,17.572 21.59,18.161 0.072,39.253 1.342,39.253 0.072,40.269 1.342,40.269 0.072,41.285 1.342,41.285 0.072,42.301 1.342,42.301
VOUT: C4.2 C5.2 C6.2 C7.2 U2.9 U2.12 U2.25 U2.26 U2.27 U2.28 U2.29 U3.2 U3.5 U4.2 U4.5 U5.2 U5.5 | length 13.7
  Top Layer w0.4: v1(19.485,17.606) 19.523,17.644 19.523,17.992 20.745,19.213 22.189,19.213 v1(22.225,19.177)
  Bottom Layer w0.4: v1(19.485,17.606) 19.493,17.615 U2.12@19.493,18.169 ; U2.9 21.778,19.57 22.171,19.177 v1(22.225,19.177)
  Bottom Layer w0.8: U5.5 U5.2 ; U4.5 U4.2 ; U3.5 U3.2
  other v1: 10.287,21.844 11.416,21.835 12.446,21.835 13.462,21.835 10.287,22.733 11.416,22.733 12.446,22.724 13.462,22.724 48.17,30.673 49.44,30.673 48.17,31.689 49.44,31.689 12.273,34.314 13.416,34.314 24.548,34.61 25.818,34.61 12.273,35.076 13.416,35.076 24.548,35.626 25.818,35.626 12.273,35.838 13.416,35.838 13.416,36.727
pads on no net: *.1 *.3 *.5 *.7 *.8 *.10 *.11 *.12 *.13 *.15 *.16 *.17 *.18 *.19 *.21 *.22 *.23 *.24 *.26 *.27 *.28 *.29 *.31 *.32 *.33 *.35 *.36 *.37 *.38 *.40 J1. J1.A8 J1.B8 J2.4 P1.P1 P1.P2 P2.P1 P2.P2 U2.20

## Polygon pours and split planes (outlines as drawn)
GND on Top Layer "GND_L01_P000" (solid, remove dead copper, pour order 0): -3.81,52.705 61.595,52.705 61.595,-3.683 -3.81,-3.683
GND on Bottom Layer "GND_L02_P001" (solid, remove dead copper, pour order 1): -3.81,52.197 -3.81,52.705 61.595,52.705 61.595,-3.683 -3.81,-3.683

## Keep-outs
Keep-Out Layer:
  the board outline again, w0.254

## Other copper
Top Layer:
  region net VOUT: 19.685,18.034 18.034,18.034 15.494,15.494 15.494,13.963 13.977,12.446 9.906,12.446 8.001,14.351 8.001,20.955 6.731,22.225 4.445,22.225 4.445,22.191 5.969,20.667 5.969,13.716 8.509,11.176 14.605,11.176 19.939,16.51 19.939,18.034 19.565,18.034 19.523,17.992
  region net VBUS_B: 14.224,24.384 10.16,24.384 9.525,25.019 9.525,31.242 10.033,31.75 15.875,31.75 16.764,32.639 16.764,37.465 18.796,39.497 23.241,39.497 23.241,41.402 22.479,42.164 18.161,42.164 14.859,38.862 14.859,33.528 8.763,33.528 7.493,32.258 7.493,24.384 8.382,23.495 14.224,23.495
  region net VBUS_A: 42.418,28.067 41.91,27.559 41.91,3.937 42.672,3.175 47.625,3.175 48.514,4.064 48.514,27.432 47.879,28.067 43.053,28.067
  region net VBUS_A: 20.193,18.161 20.193,16.002 14.859,10.668 9.271,10.668 8.509,9.906 8.509,6.985 8.763,6.731 16.764,6.731 22.479,12.446 22.479,16.383 20.701,18.161
  region net VBUS_C: 21.653,18.86 25.146,15.367 25.146,10.541 18.542,3.937 12.446,3.937 12.065,4.318 12.065,6.35 17.018,6.35 22.86,12.192 22.86,16.256 20.955,18.161
  region net VBUS_C: 2.032,43.307 -1.016,43.307 -1.016,5.715 0.762,3.937 13.081,3.937 13.081,5.715 12.446,6.35 2.921,6.35 2.032,7.239
  region net VBUS_C: 20.955,18.161 22.225,16.891 22.606,16.891 22.606,17.907 21.653,18.86
  region net VOUT: 14.224,39.37 11.938,41.656 5.969,41.656 3.556,39.243 3.556,23.114 5.715,20.955 7.62,20.955 7.62,23.241 5.715,25.146 5.715,38.481 6.985,39.751 11.43,39.751 12.319,38.862 13.716,38.862
  region net VOUT: 5.715,20.921 14.224,20.921 14.224,23.207 5.715,23.207
  region net VOUT: 11.684,36.83 17.526,42.672 23.114,42.672 24.13,41.656 24.13,36.322 26.416,36.322 26.289,36.449 26.289,41.91 27.051,42.672 31.369,42.672 33.782,45.085 53.086,45.085 54.737,43.434 54.737,35.306 51.737,32.306 47.704,32.306 47.752,32.258 47.704,32.21 47.704,30.018 53.962,30.018 57.658,33.845 57.658,44.069 54.229,47.498 33.02,47.498 30.226,44.704 16.891,44.704 11.684,39.497
  region net VOUT: 47.704,33.701 47.704,30.018 49.99,30.018 49.99,33.701
  region net VOUT: 24.13,37.465 24.13,33.782 26.416,33.782 26.416,37.465
  region net VOUT: 11.684,39.116 11.684,33.782 13.97,33.782 13.97,39.116
Bottom Layer:
  region net VBUS_A: 53.975,-0.508 49.784,-0.508 49.657,-0.381 49.657,2.413 50.419,3.175 48.768,3.175 48.768,2.794 49.149,2.413 49.149,-1.397 49.784,-2.032 54.356,-2.032 54.61,-1.778 54.61,3.937 53.467,5.08 48.133,5.08 48.133,2.794 53.848,2.794 54.102,2.54 54.102,-0.381
  region net VOUT: 48.894,33.734 46.1,33.734 45.973,33.861 45.211,33.861 45.211,33.099 45.973,33.099 45.973,33.226 46.1,33.353 48.894,33.353
  region net VOUT: 25.272,37.417 22.478,37.417 22.351,37.544 21.589,37.544 21.589,36.782 22.351,36.782 22.351,36.909 22.478,37.036 25.272,37.036
  region net VOUT: 12.827,37.465 10.033,37.465 9.906,37.592 9.144,37.592 9.144,36.83 9.906,36.83 9.906,36.957 10.033,37.084 12.827,37.084
  region net VBUS_A: 15.367,6.35 16.002,6.35 18.034,4.318 18.034,3.556 15.367,3.556
  region net VBUS_A: 9.652,10.668 8.763,9.779 8.763,4.064 10.033,2.794 50.927,2.794 51.689,3.556 51.689,5.08 51.054,5.715 41.529,5.715 40.132,4.318 16.002,4.318 16.002,9.525 14.859,10.668 9.779,10.668
  region net VOUT: 47.691,33.745 47.691,30.062 49.977,30.062 49.977,33.745
  region net VOUT: 24.069,37.428 24.069,33.745 26.355,33.745 26.355,37.428
  region net VOUT: 11.684,37.465 11.684,33.782 13.97,33.782 13.97,37.465
  region net NetC9_2: 21.59,23.622 22.86,23.622 23.749,24.511 23.749,26.289 24.384,26.924 33.655,26.924 34.29,26.289 34.29,21.971 28.956,21.971 28.956,24.892 28.702,25.146 25.146,25.146 25.019,25.019 25.019,23.368 24.003,22.352 21.59,22.352
  region net NetC8_2: 18.415,15.875 23.749,15.875 24.892,14.732 24.892,10.668 25.527,10.033 25.527,9.271 18.415,9.271
  region net VOUT: 8.001,19.939 8.001,23.241 15.24,23.241 15.24,20.955 10.033,20.955 9.398,20.32 9.398,19.939
  region net VBUS_C: 7.62,45.847 7.62,44.45 6.477,43.307 6.477,40.005 8.128,40.005 8.128,45.847
  region net VBUS_A: 43.271,40.132 39.878,40.132 37.719,37.973 37.719,27.051 45.72,19.05 54.229,19.05 54.229,28.321 41.402,28.321 40.259,29.464 40.259,33.528 41.761,35.03 43.271,35.03
  region net VBUS_B: 19.558,47.879 19.558,45.847 18.796,45.085 18.796,37.846 19.939,37.846 19.939,47.879
  region net VBUS_A: 44.377,34.232 45.012,34.232 45.012,35.299 45.215,35.502 46.028,35.502 46.202,35.328 46.202,34.232 46.917,34.232 46.917,35.629 46.663,35.883 38.735,35.883 38.735,34.232
  region net VBUS_B: 20.781,37.875 21.416,37.875 21.416,38.942 21.619,39.145 22.432,39.145 22.606,38.971 22.606,37.875 23.321,37.875 23.321,41.449 19.939,44.831 18.796,44.831 18.796,37.875
  region net VBUS_C: -1.016,37.973 8.89,37.973 8.89,38.989 9.144,39.243 9.906,39.243 10.16,38.989 10.16,37.973 10.795,37.973 10.795,40.132 7.62,43.307 -1.016,43.307
  region net VBUS_B: 15.24,23.495 9.271,23.495 9.271,24.257 14.605,24.257 15.24,23.622
  region net VBUS_C: 20.32,19.05 21.463,19.05 22.606,17.907 22.606,16.891 22.225,16.891 20.32,18.796 20.32,18.923
  region net VBUS_A: 19.939,18.669 19.939,17.018 20.701,16.256 22.098,16.256 22.098,16.764 20.193,18.669
  pour cut-out: 25.654,12.319 28.575,12.319 28.575,15.367 34.671,15.367 34.671,12.319 37.846,12.319 37.846,24.765 34.544,24.765 34.544,21.717 28.702,21.717 28.702,24.765 25.654,24.765
  region net NetC11_2: 16.383,18.669 16.383,17.653 15.494,16.764 14.986,16.764 14.986,15.748 16.002,15.748 16.002,16.256 16.637,16.891 16.637,18.669
  region net BAT+: 16.891,9.779 16.891,7.366 18.669,5.588 38.735,5.588 40.386,7.239 40.386,8.763 27.305,8.763 27.305,7.493 26.797,6.985 24.765,6.985 24.13,7.62 24.13,8.636 23.749,9.017 18.415,9.017 18.161,9.271 18.161,9.779
  region net BAT+: 18.161,18.288 17.653,17.78 17.653,15.621 16.891,14.859 16.891,9.271 18.161,9.271
  region net BAT+: 17.907,18.796 17.907,17.78 18.161,17.78 18.161,18.796
  region net NetC8_2: 26.416,10.287 26.162,10.287 18.669,17.78 18.669,18.034 18.415,18.034 18.415,9.271 25.527,9.271 26.416,9.271
  region net NetC8_2: 18.415,18.796 18.415,17.78 18.669,17.78 18.669,18.796
  region net BAT+: 54.102,9.525 54.102,11.43 53.086,12.446 42.418,12.446 39.751,9.779 39.751,9.144 44.704,9.144 44.704,9.906 45.466,10.668 49.784,10.668 50.673,9.779 50.673,9.525
  region net NetP1_2: 45.974,8.89 48.26,8.89 48.768,8.382 54.102,8.382 54.102,7.493 48.387,7.493 47.752,8.128 45.974,8.128
  region net BAT+: 27.305,8.763 38.735,8.763 39.751,9.779 43.053,9.779 43.053,7.239 27.305,7.239
  region net BAT+: 44.704,7.874 43.434,7.874 43.307,8.001 43.307,9.017 43.434,9.144 44.704,9.144 44.704,9.779 42.672,9.779 42.672,7.239 44.704,7.239
  region net NetP1_2: 43.561,8.763 47.244,8.763 47.244,8.255 43.561,8.255
  region net NetC8_2: 25.527,10.795 28.194,10.795 28.956,11.557 28.956,15.113 34.29,15.113 34.29,11.684 35.433,10.541 36.322,10.541 36.322,9.271 25.527,9.271
  region net NetC9_2: 20.32,23.114 21.082,23.114 21.59,23.622 23.114,23.622 23.114,22.352 21.59,22.352 21.209,21.971 21.209,20.955 20.32,20.955
  text "VIETTIEN" at 51.055,35.941 h0.8

## Silkscreen, mask and mechanical layers (free items; w line width, h text height)
Bottom Overlay:
  lines w0.254: 5.207,47.879 4.572,47.879 4.572,42.799 12.319,42.799 ; 17.653,42.799 27.686,42.799 27.686,47.498 25.527,47.498 ; 34.036,41.656 34.036,38.481 37.211,38.481 ; 34.163,48.895 34.163,51.308 37.084,51.308 ; 47.117,13.335 41.529,13.335 41.529,6.223 51.054,6.223 ; 48.387,21.844 48.387,22.987 51.308,22.987 ; 48.514,14.986 48.514,14.605 50.927,14.605 ; 50.546,13.335 51.308,13.335
  text "OUTPUT" at 34.816,48.076 h1.52 r90
  text "INPUT" at 16.945,41.746 h1.52
  text "00%-10%" at 7.204,22.603 h0.8
  text "OUTPUT" at 48.932,21.263 h1.52 r90
  text "10%-20%" at 7.204,20.19 h0.8
  text "20%-40%" at 7.205,17.904 h0.8
  text "40%-60%" at 7.204,15.618 h0.8
  text "60%-80%" at 7.204,13.227 h0.8
  text "PIN" at 49.965,12.9 h1.52
  text "PWR" at -1.905,6.752 h1.5 r270